# Altium PCB GR_Barillet.PcbDoc
Units mm, origin at the board's own origin, x right, y up, seen from the top; angles counter-clockwise.
Board outline 110 x 55 mm, 2 copper layers (Top Layer, Bottom Layer); 57 components, 59 nets, 210 pads, 24 vias.
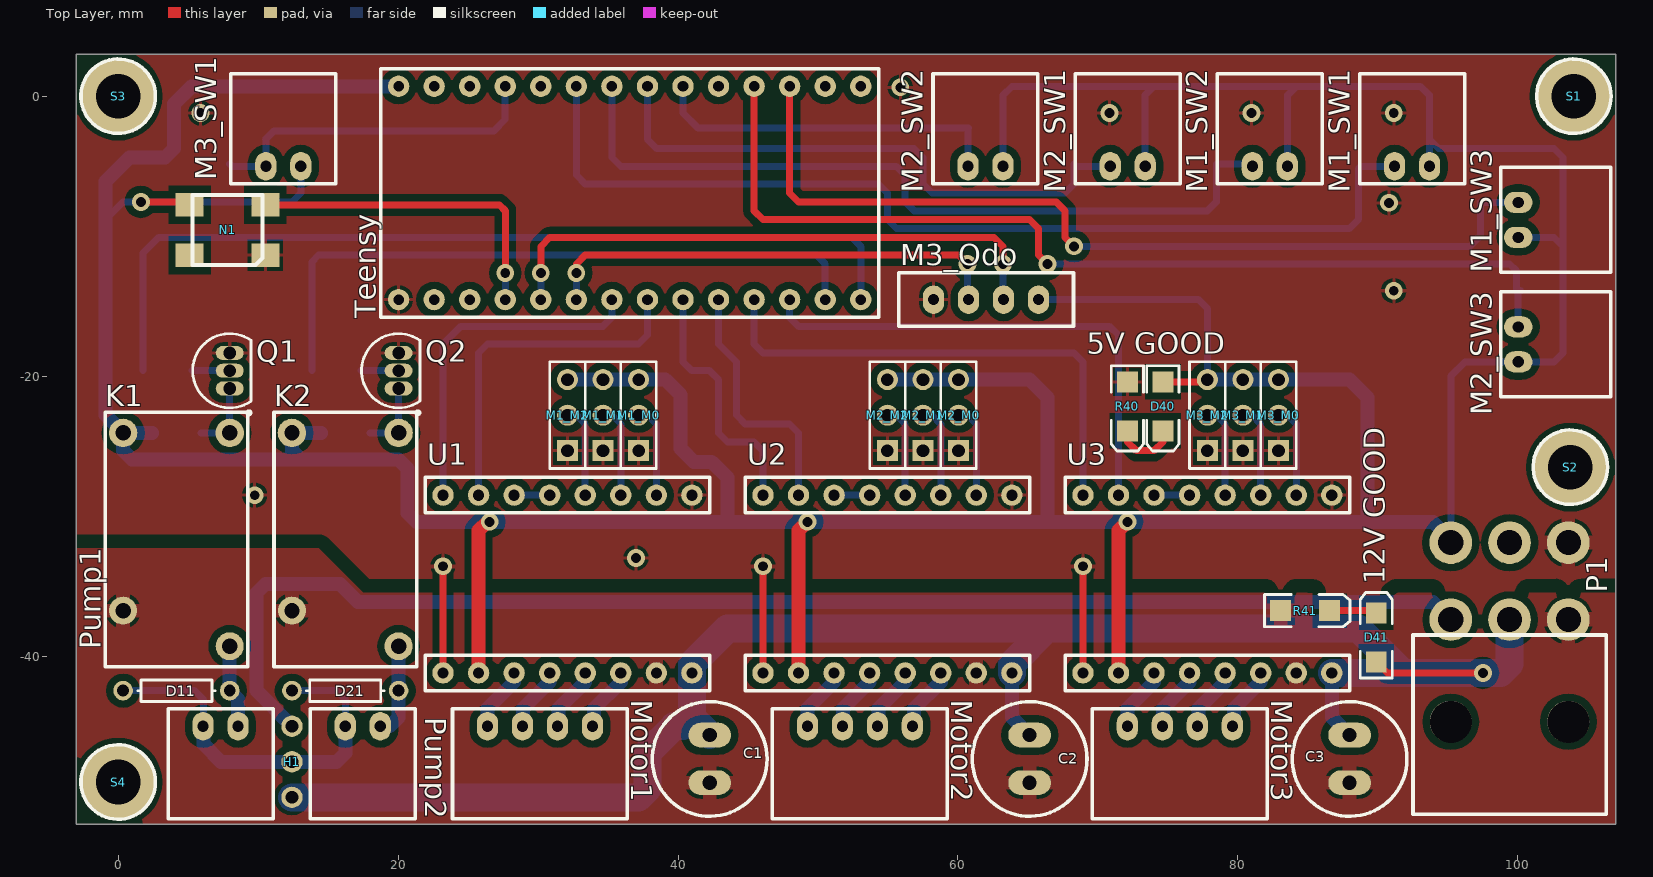
[diagram p0: Top Layer view]
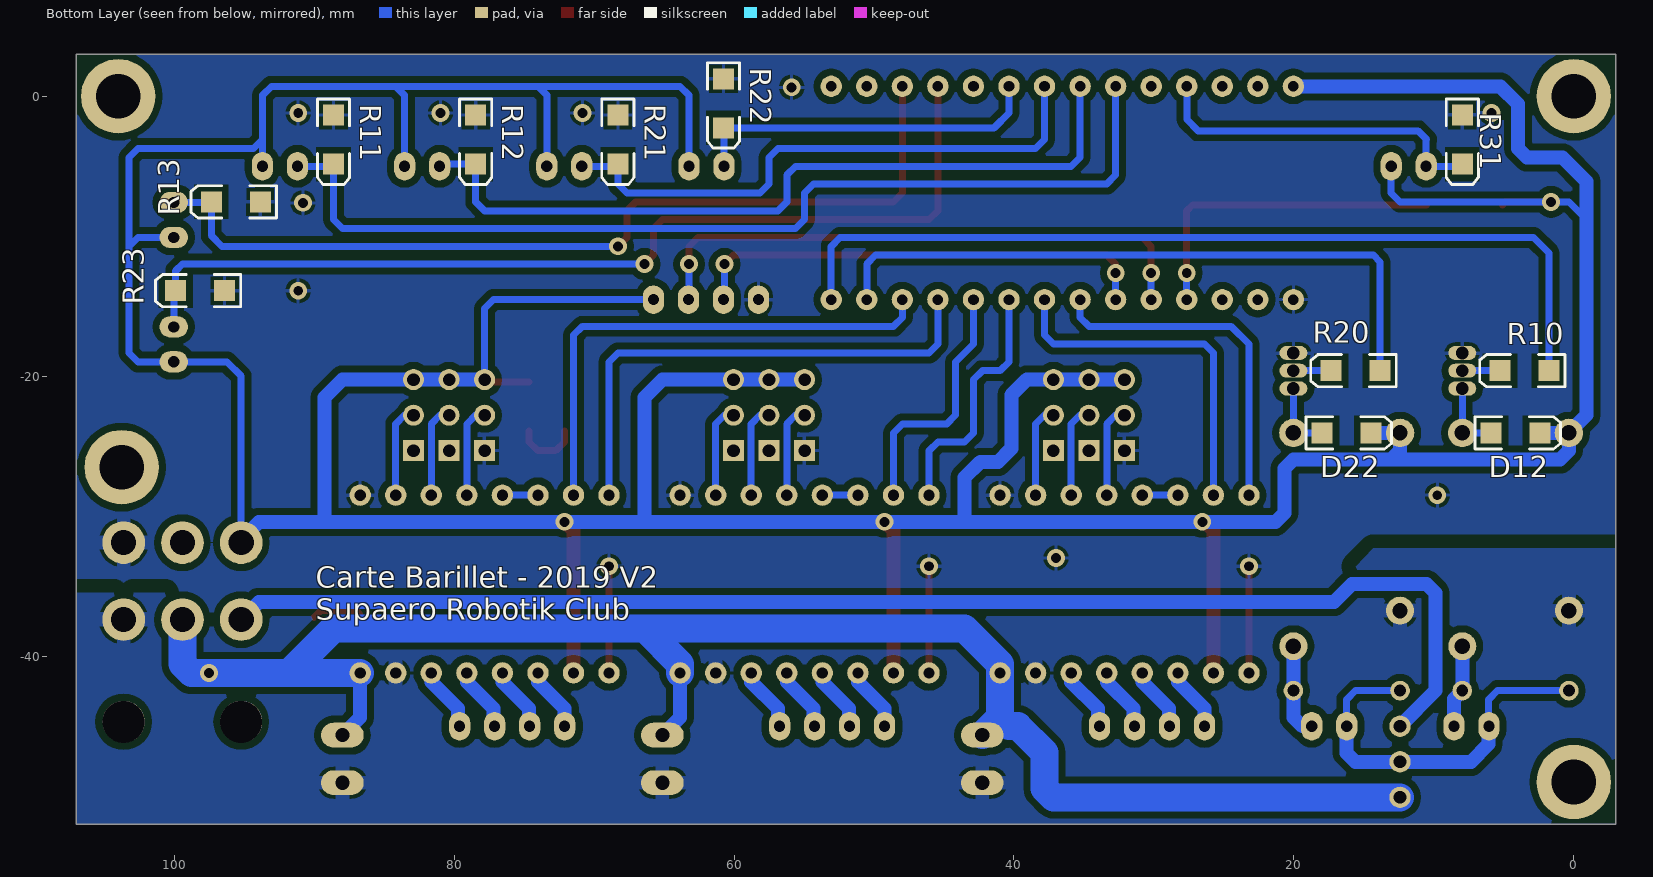
[diagram p1: Bottom Layer view, seen from below]

## Layer stack, top to bottom
Top Solder: solder mask 0.0102, Solder Resist, Dk 3.5
Top Layer: signal copper 0.0356
Dielectric 1: dielectric 0.32, FR-4, Dk 4.8
Bottom Layer: signal copper 0.0356
Bottom Solder: solder mask 0.0102, Solder Resist, Dk 3.5

## Board outline
-3,-52 107,-52 107,3 -3,3

## Design rules (kind name [scope] priority, off if disabled: settings)
Clearance 2 [All] p1: gap=0.254 except(0.508: Arc-Poly Track-Poly SMDPad-Poly THPad-Poly Via-Poly Fill-Poly Poly-Region Poly-Text; 1.016: Poly-Poly)
ComponentClearance VoltSlect [All] p1: gap=0 collisioncheckmode=3 verticalgap=0 showdistances=FALSE
ComponentClearance "Resistance LED" [HasFootprint('3.2X1.6X1.1') vs HasFootprint('3.2X1.6X1.1')] p2: gap=0 collisioncheckmode=3 verticalgap=0 showdistances=FALSE
ComponentClearance "Header Motor 3D" [OnMechanical vs OnMechanical] p3: gap=0 collisioncheckmode=3 verticalgap=0 showdistances=FALSE
ComponentClearance "Header Motor" [HasFootprint('HDR1X3') vs OnMechanical Or HasFootprint('HDR1X3')] p4: gap=0 collisioncheckmode=3 verticalgap=0 showdistances=FALSE
ComponentClearance ComponentClearance_1 [All] p5: gap=0.254 collisioncheckmode=3 verticalgap=0.254 showdistances=FALSE
PolygonConnect PolygonConnect_GNDL [InNet('GND_L') vs HasFootprint('MOLEX_MINIFITJR_3X2')] p1: connectstyle=Relief reliefconductorwidth=1.016 reliefentries=4 polygonreliefangle="90 Angle" airgapwidth=0.254
PolygonConnect PolygonConnect_GNDA [InNet('GND_A')] p2: connectstyle=Relief reliefconductorwidth=1.016 reliefentries=4 polygonreliefangle="90 Angle" airgapwidth=0.254
PolygonConnect PolygonConnect_1 [All] p3: connectstyle=Relief reliefconductorwidth=0.254 reliefentries=4 polygonreliefangle="90 Angle" airgapwidth=0.254
RoutingVias [All] p1: holewidth=0.711 width=1.27 viastyle="Through Hole" minholewidth=0.711 minwidth=1.27 maxholewidth=0.711 maxwidth=1.27
SolderMaskExpansion [All] p1: expansion=0.102
Width [All] p1: maxlimit=2 minlimit=0.254 preferedwidth=0.5
29 further rules are at their usual default settings.

## Components (designator, comment, footprint, x,y, rotation, side; value= is the part's Value field where it differs from the comment)
C1 "Cap2" Condensateur 42.26,-45.65 r270 top
C2 "Cap2" Condensateur 65.12,-45.65 r270 top
C3 "Cap2" Condensateur 87.98,-45.65 r270 top
D11 "Diode" AXIAL-0.3 4.16,-42.475 r180 top
D12 "Diode" 3.2X1.6X1.1 4.16,-24.06 r180 bottom
D21 "Diode" AXIAL-0.3 16.225,-42.475 r180 top
D22 "Diode" 3.2X1.6X1.1 16.225,-24.06 r180 bottom
D40 "LED0" 3.2X1.6X1.1 74.645,-22.155 r270 top
D41 "LED0" 3.2X1.6X1.1 89.885,-38.665 r90 top
H1 "Voltage Selector" "VOLTAGE SELECTOR" 12.415,-47.555 r180 top
K1 "Relay-SPST" Relay 4.16,-31.68 r0 top
K2 "Relay-SPST" Relay 16.225,-31.68 r0 top
M1_M0 "Header 3" HDR1X3 37.18,-25.33 r90 top
M1_M1 "Header 3" HDR1X3 34.64,-25.33 r90 top
M1_M2 "Header 3" HDR1X3 32.1,-25.33 r90 top
M1_SW1 "Header 2H" "Molex SPOX 2x1H" 93.695,-5.01 r180 top
M1_SW2 "Header 2H" "Molex SPOX 2x1H" 83.535,-5.01 r180 top
M1_SW3 "Header 2H" "Molex SPOX 2x1H" 100.03,-10.09 r90 top
M2_M0 "Header 3" HDR1X3 60.04,-25.33 r90 top
M2_M1 "Header 3" HDR1X3 57.5,-25.33 r90 top
M2_M2 "Header 3" HDR1X3 54.96,-25.33 r90 top
M2_SW1 "Header 2H" "Molex SPOX 2x1H" 73.375,-5.01 r180 top
M2_SW2 "Header 2H" "Molex SPOX 2x1H" 63.215,-5.01 r180 top
M2_SW3 "Header 2H" "Molex SPOX 2x1H" 100.03,-18.98 r90 top
M3_M0 "Header 3" HDR1X3 82.9,-25.33 r90 top
M3_M1 "Header 3" HDR1X3 80.36,-25.33 r90 top
M3_M2 "Header 3" HDR1X3 77.82,-25.33 r90 top
M3_Odo "Header 4H" "Molex SPOX 4x1H" 65.755,-14.535 r180 top
M3_SW1 "Header 2H" "Molex SPOX 2x1H" 13.05,-5.01 r180 top
Motor1 "Header 4H" "Molex SPOX 4x1H" 26.385,-45.015 r0 top
Motor2 "Header 4H" "Molex SPOX 4x1H" 49.245,-45.015 r0 top
Motor3 "Header 4H" "Molex SPOX 4x1H" 72.105,-45.015 r0 top
N1 "NeoPixel" Neopixel 10.51,-11.36 r180 top
P1 "Header 3X2H" MOLEX_MINIFITJR_3X2 99.41,-37.395 r0 top
Pump1 "Header 2H" "Molex SPOX 2x1H" 6.065,-45.015 r0 top
Pump2 "Header 2H" "Molex SPOX 2x1H" 16.225,-45.015 r0 top
Q1 "NPN" TO-226-AA 7.97,-19.615 r0 top
Q2 "NPN" TO-226-AA 20.035,-19.615 r0 top
R10 "Res2" 3.2X1.6X1.1 3.525,-19.615 r0 bottom
R11 "Res1" 3.2X1.6X1.1 88.615,-3.105 r270 bottom
R12 "Res1" 3.2X1.6X1.1 78.455,-3.105 r270 bottom
R13 "Res1" 3.2X1.6X1.1 95.6,-7.55 r0 bottom
R20 "Res2" 3.2X1.6X1.1 15.59,-19.615 r0 bottom
R21 "Res1" 3.2X1.6X1.1 68.295,-3.105 r270 bottom
R22 "Res1" 3.2X1.6X1.1 60.75,-0.505 r270 bottom
R23 "Res1" 3.2X1.6X1.1 98.14,-13.9 r0 bottom
R31 "Res1" 3.2X1.6X1.1 7.97,-3.105 r270 bottom
R40 "Res2" 3.2X1.6X1.1 72.105,-22.155 r270 top
R41 "Res2" 3.2X1.6X1.1 84.805,-36.76 r0 top
S1 "Screw M3" "Screw M3" 104,0 r0 top
S2 "Screw M3" "Screw M3" 103.75,-26.505 r0 top
S3 "Screw M3" "Screw M3" 0,0 r0 top
S4 "Screw M3" "Screw M3" 0,-49 r0 top
Teensy "Teensy 3.2" teensy 40.355,-17.075 r90 top
U1 "DRV8825" DRV8825 40.99,-28.505 r270 top
U2 "DRV8825" DRV8825 63.85,-28.505 r270 top
U3 "DRV8825" DRV8825 86.71,-28.505 r270 top

## Footprints (in the part's own frame and the unit in brackets; to place one, negate y for a bottom-side part, rotate by r counter-clockwise, add the part's x,y. Pads: shape width x height; smd on the part's side, far side on the other; paste and mask are expansions set on the pad)
3.2X1.6X1.1 [mm] "SMT LED; 2 Flat Leads"
  rect 1.5x1.5 smd: 1(-1.75,0) 2(1.75,0)
  silkscreen extent -2.9,-1.15 3.2,1.15
AXIAL-0.3 [mm] "Axial Device, Thru-Hole; 2 Leads; 0.3 in Pin Spacing"
  round 1.4 hole 0.85: 1(-3.81,0) 2(3.81,0)
  silkscreen extent -2.77,-0.76 2.77,0.76
Condensateur [mil]
  oval 70x120 hole 40: 1(0,0) 2(133.86,0)
  silkscreen extent -94,-161 228,161, body extent -93,-160 227,160, height 500
DRV8825 [mil] "Stepper Driver"
  round 60 hole 31.5: 1(0,0) 2(0,-100) 3(0,-200) 4(0,-300) 5(0,-400) 6(0,-500) 7(0,-600) 8(0,-700) 9(500,-700) 10(500,-600) 11(500,-500) 12(500,-400) 13(500,-300) 14(500,-200) 15(500,-100) 16(500,0)
  silkscreen extent -50,-750 550,50, body extent -50,-764 550,63, height 446
HDR1X3 [mm] "Connector; Header; 3 Position"
  rect 1.5x1.5 hole 0.9: 1(0,0)
  round 1.5 hole 0.9: 2(2.54,0) 3(5.08,0)
  silkscreen extent -1.27,-1.27 6.35,1.27
"Molex SPOX 2x1H" [mil] "Prise CI, Molex, 3 Contacts, 1 rangée, entraxe 2.5mm, 3A, Coudé, ref 22-03-5035"
  oval 60x80 hole 31.5: 1(0,0) 2(98.43,0)
  silkscreen extent -98,-260 197,49, body extent -98,-262 193,49, height 193
"Molex SPOX 4x1H" [mil] "Prise CI, Molex, 3 Contacts, 1 rangée, entraxe 2.5mm, 3A, Coudé, ref 22-03-5035"
  oval 60x80 hole 31.5: 1(0,0) 2(98.43,0) 3(196.85,0) 4(295.28,0)
  silkscreen extent -98,-75 394,75
MOLEX_MINIFITJR_3X2 [mm] "MOLEX_MINIFITJR_3X2, 39-30-1060"
  round 3.048 hole 1.8: 1(-4.2,5.5) 2(-4.2,0) 3(0,5.5) 4(0,0) 5(4.2,5.5) 6(4.2,0)
  round 3 hole 3 unplated: 10(-4.2,-7.3) 11(4.2,-7.3)
  silkscreen extent -6.9,-13.9 6.9,-1.1, body extent -6.9,-13.9 7.3,6.04, height 11.41
Neopixel [mm]
  rect 2x1.7 smd: 1(0,0) 2(0,-3.6) 3(5.4,-3.6) 4(5.4,0)
  silkscreen extent 0.2,-4.3 5.2,0.7, body extent 0.19,-4.33 5.19,0.67, height 2
Relay [mm] "SPST-NO Relay"
  round 2 hole 1.1: 1(3.81,-7.62) 2(-3.81,-5.08)
  round 2.032 hole 1.1: 3(-3.81,7.62) 4(3.81,7.62)
  silkscreen extent -5.09,-9.09 5.09,9.09, body extent -5.08,-9.14 5.08,9.14, height 15
"Screw M3" [mm] "M3 iso Screw"
  round 5.32 hole 3.2 unplated: 0(0,0)
  silkscreen extent -2.66,-2.66 2.66,2.66
teensy [mil] "Teensy 3.2"
  round 60 hole 30: 0(100,700) 1(100,600) 2(100,500) 3(100,400) 4(100,300) 5(100,200) 6(100,100) 7(100,0) 8(100,-100) 9(100,-200) 10(100,-300) 11(100,-400) 12(100,-500) 13(700,-500) 14(700,-400) 15(700,-300) 16(700,-200) 17(700,-100) 18(700,0) 19(700,100) 20(700,200) 21(700,300) 22(700,400) 23(700,500) 41(700,600) 42(700,700) 43(700,800) 44(100,800)
  silkscreen extent 50,-550 750,850, body extent 48,-550 752,907, height 505
TO-226-AA [mm] "TO, Flat Index; 3 In-Line, Axial Leads; Body Dia. 4.8mm; Leads 0.55 x 0.51 mm (max)"
  oval 2x1 hole 0.9: 1(0,-1.27) 2(0,0) 3(0,1.27)
  silkscreen extent -2.65,-3.13 1.52,2.65, body extent -2.65,-2.66 1.52,2.66, height 5.33
"VOLTAGE SELECTOR" [mil] "3 Pads for Voltage Selection"
  round 60 hole 35.43: 1(0,100) 2(0,-100) 3(0,0)
  body extent -50,-150 50,150, height 340

## Part data
C1 C2 C3: "Capacitor"
D11 D12 D21 D22: "Default Diode"
D40 D41: "Typical INFRARED GaAs LED"
H1: "Selection of voltage by soldering pads"
K1 K2: "Single-Pole Single-Throw Relay"
M1_M0 M1_M1 M1_M2 M2_M0 M2_M1 M2_M2 M3_M0 M3_M1 M3_M2: "Header, 3-Pin"
M1_SW1 M1_SW2 M1_SW3 M2_SW1 M2_SW2 M2_SW3 M3_SW1 Pump1 Pump2: "Header, 2-Pin, Right Angle"
M3_Odo Motor1 Motor2 Motor3: "Header, 4-Pin, Right Angle"
P1: "Header, 3-Pin, Dual row, Right Angle"
Q1 Q2: "NPN Bipolar Transistor"
R10 R20 R40 R41: "Resistor"
R11 R12 R13 R21 R22 R23 R31: library part Res2, "Resistor"
Teensy: library part teensy3.2
U1 U2 U3: "Stepper Driver Module"

## Via types
v1: diameter 1.27, hole 0.711, Top Layer to Bottom Layer, 17 vias
v2: diameter 1.27, hole 0.7, Top Layer to Bottom Layer, 7 vias

## Nets (pads, with @x,y where several pads share a name; then routed paths per layer and width w, separated by ;. In a path a pad name is that pad's centre, name@x,y a point inside that pad or via, vN(x,y) a via of type N, cw(c..) or ccw(c..) an arc to the next point about the centre after c; other vN are vias at no path point)
3V3_A: H1.2 P1.2 | length 97.2
  Bottom Layer w1: H1.2 9.875,-42.475 9.875,-35.49 10.51,-34.855 15.855,-34.855 17.125,-36.125 93.94,-36.125 P1.2
5V_L: D12.2 D22.2 D40.1 K1.3 K2.3 M1_M0.3 M1_M1.3 M1_M2.3 M1_SW1.1 M1_SW2.1 M1_SW3.1 M2_M0.3 M2_M1.3 M2_M2.3 M2_SW1.1 M2_SW2.1 M2_SW3.1 M3_M0.3 M3_M1.3 M3_M2.3 M3_Odo.1 M3_SW1.1 N1.3 P1.1 Teensy.43 U1.10 U2.10 U3.10 | length 387.8
  Top Layer w0.5: v1(1.62,-7.55) 4.9,-7.55 N1.3 ; D40.1 77.665,-20.405 M3_M2.3
  Top Layer w1: U1.10 25.75,-31.045 26.385,-30.41 v1(26.544,-30.41) ; U2.10 48.61,-31.045 v1(49.245,-30.41) ; U3.10 71.47,-31.045 v1(72.105,-30.41)
  Bottom Layer w0.5: -0.92,-8.82 0.35,-7.55 v1(1.62,-7.55) 12.415,-7.55 13.05,-6.915 M3_SW1.1 ; M2_SW2.1 63.215,0.07 63.85,0.705 74.01,0.705 ; M3_Odo.1 77.185,-14.535 77.82,-15.17 M3_M2.3 ; M2_SW1.1 73.375,0.07 74.01,0.705 ; M1_SW2.1 83.535,0.07 84.17,0.705 ; M1_SW1.1 93.695,-3.105 ; P1.1 95.21,-20.005 96.235,-18.98 M2_SW3.1 102.585,-18.98 103.22,-18.345 103.22,-10.725 ; M1_SW3.1 102.585,-10.09 103.22,-10.725 ; 74.01,0.705 84.17,0.705 ; 84.17,0.705 93.06,0.705 93.695,0.07 93.695,-3.105 ; 93.695,-3.105 94.33,-3.74 102.585,-3.74 103.22,-4.375 103.22,-10.725
  Bottom Layer w1: D12.2 K1.3 ; D22.2 K2.3 12.415,-25.33 13.05,-25.965 ; Teensy.43@20.02,0.705 5.255,0.705 4,-0.55 4,-3.725 3.35,-4.375 0.81,-4.375 -0.92,-6.105 -0.92,-22.79 K1.3 ; M1_M2.3 M1_M1.3 M1_M0.3 39.085,-20.25 40.192,-21.358 40.192,-25.183 41.137,-26.127 42.407,-26.127 43.53,-27.25 43.53,-30.41 ; M2_M2.3 M2_M1.3 M2_M0.3 ; M2_M0.3@60.055,-20.25 65.12,-20.25 66.39,-21.52 66.39,-30.41 ; M3_M2.3 M3_M1.3 M3_M0.3 ; M3_M0.3@82.915,-20.25 87.98,-20.25 89.25,-21.52 89.25,-30.41 ; P1.1@95.21,-31.68 93.94,-30.41 21.305,-30.41 20.67,-29.775 20.67,-26.6 20.035,-25.965 13.05,-25.965 ; K1.3 0.35,-25.33 0.985,-25.965 13.05,-25.965
12V_A: C1.1 C2.1 C3.1 D41.1 H1.1 P1.4 U1.16 U2.16 U3.16 | length 129.5
  Top Layer w0.5: D41.1 90.675,-41.205 v2(97.505,-41.205)
  Bottom Layer w1: U2.16 63.85,-44.38 C2.1 ; U3.16 86.71,-44.38 C3.1
  Bottom Layer w2: H1.1 37.18,-50.095 37.815,-49.46 37.815,-46.905 39.705,-45.015 40.355,-45.015 40.99,-44.38 ; C1.1 40.99,-44.38 ; U2.16 63.85,-40.555 66.375,-38.03 ; U3.16 91.79,-41.205 ; P1.4 99.41,-40.57 98.775,-41.205 v2(97.505,-41.205) 91.79,-41.205 ; 40.99,-44.38 U1.16 40.99,-40.57 43.53,-38.03 88.615,-38.03 91.79,-41.205
15V_L: P1.3
GND_A: C1.2 C2.2 C3.2 K1.2 K2.2 P1.6 R41.1 U1.15 U2.15 U3.15
GND_L: M1_M0.1 M1_M1.1 M1_M2.1 M2_M0.1 M2_M1.1 M2_M2.1 M3_M0.1 M3_M1.1 M3_M2.1 M3_Odo.4 N1.1 P1.5 Q1.3 Q2.3 R11.1 R12.1 R13.1 R21.1 R22.1 R23.1 R31.1 R40.1 Teensy.44 U1.1 U1.9 U2.1 U2.9 U3.1 U3.9 | length 22.9
  Top Layer w0.5: U1.9 v1(23.21,-33.585) ; U2.9 v1(46.07,-33.585) ; U3.9 v1(68.93,-33.585)
  other v1: 90.805,-7.62 5.89,-1.2 55.88,0.635
  other v2: 37,-33 9.75,-28.505 91.14,-13.9 70.82,-1.2 80.98,-1.2 91.14,-1.2
M1_DIR: Teensy.5 U1.8 | length 24.9
  Bottom Layer w0.5: U1.8 23.21,-17.71 24.48,-16.44 34.64,-16.44 35.275,-15.805 Teensy.5
M1_M0: M1_M0.2 U1.2 | length 6.6
  Bottom Layer w0.5: M1_M0.2 37.815,-22.79 38.45,-23.425 U1.2
M1_M1: M1_M1.2 U1.3 | length 6.6
  Bottom Layer w0.5: M1_M1.2 35.275,-22.79 35.91,-23.425 U1.3
M1_M2: M1_M2.2 U1.4 | length 6.6
  Bottom Layer w0.5: M1_M2.2 32.735,-22.79 33.37,-23.425 U1.4
M1_STP: Teensy.6 U1.7 | length 25.3
  Bottom Layer w0.5: U1.7 25.75,-18.345 26.385,-17.71 37.18,-17.71 37.815,-17.075 Teensy.6
M1_SW1: M1_SW1.2 R11.2 Teensy.21 | length 71.5
  Bottom Layer w0.5: Teensy.21 32.735,-5.645 33.37,-6.28 54.325,-6.28 54.96,-6.915 54.96,-8.82 55.595,-9.455 87.98,-9.455 88.615,-8.82 88.615,-5.165 88.77,-5.01 M1_SW1.2
M1_SW2: M1_SW2.2 R12.2 Teensy.20 | length 56.6
  Bottom Layer w0.5: Teensy.20 35.275,-4.375 35.91,-5.01 55.595,-5.01 56.23,-5.645 56.23,-7.55 56.865,-8.185 77.82,-8.185 78.455,-7.55 R12.2 80.88,-4.855 M1_SW2.2
M1_SW3: M1_SW3.2 R13.2 Teensy.15 | length 65.1
  Top Layer w0.5: Teensy.15 47.975,-6.915 48.61,-7.55 67.025,-7.55 67.66,-8.185 67.66,-10.09 v1(68.295,-10.725)
  Bottom Layer w0.5: v1(68.295,-10.725) 96.59,-10.725 97.35,-9.965 R13.2 ; R13.2@97.39,-7.59 M1_SW3.2
M2_DIR: Teensy.7 U2.8 | length 18.2
  Bottom Layer w0.5: Teensy.7 40.355,-18.98 40.99,-19.615 42.26,-19.615 42.895,-20.25 42.895,-24.06 43.53,-24.695 45.435,-24.695 46.07,-25.33 U2.8
M2_M0: M2_M0.2 U2.2 | length 6.6
  Bottom Layer w0.5: M2_M0.2 60.675,-22.79 61.31,-23.425 U2.2
M2_M1: M2_M1.2 U2.3 | length 6.6
  Bottom Layer w0.5: M2_M1.2 58.135,-22.79 58.77,-23.425 U2.3
M2_M2: M2_M2.2 U2.4 | length 6
  Bottom Layer w0.5: M2_M2.2@55.595,-22.79 56.23,-23.425 U2.4
M2_STP: Teensy.8 U2.7 | length 18.2
  Bottom Layer w0.5: Teensy.8 42.895,-17.71 44.165,-18.98 44.165,-22.79 44.8,-23.425 47.975,-23.425 48.61,-24.06 U2.7
M2_SW1: M2_SW1.2 R21.2 Teensy.19 | length 41.3
  Bottom Layer w0.5: Teensy.19 37.815,-3.105 38.45,-3.74 56.865,-3.74 57.5,-4.375 57.5,-6.28 58.135,-6.915 67.66,-6.915 68.295,-6.28 R21.2 68.45,-5.01 M2_SW1.2
M2_SW2: M2_SW2.2 R22.2 Teensy.18 | length 25.5
  Bottom Layer w0.5: Teensy.18 40.355,-1.2 41.41,-2.255 R22.2 60.715,-2.29 M2_SW2.2
M2_SW3: M2_SW3.2 R23.2 Teensy.16 | length 69.7
  Top Layer w0.5: Teensy.16 45.435,-8.185 46.07,-8.82 65.12,-8.82 65.755,-9.455 65.755,-11.36 v1(66.39,-11.995)
  Bottom Layer w0.5: v1(66.39,-11.995) 99.41,-11.995 99.89,-12.475 R23.2 ; M2_SW3.2@100.03,-15.845 100.03,-14.055 R23.2@100.185,-13.9
M3_A: M3_Odo.2 Teensy.3 | length 41.2
  Top Layer w0.5: v1(30.195,-12.63) 30.195,-10.725 30.83,-10.09 62.58,-10.09 63.215,-10.725 v1(63.215,-11.995)
  Bottom Layer w0.5: Teensy.3 v1(30.195,-12.63) ; v1(63.215,-11.995) 63.215,-14.495 M3_Odo.2
M3_B: M3_Odo.3 Teensy.4 | length 33.6
  Top Layer w0.5: v1(32.735,-12.63) 32.735,-11.995 33.37,-11.36 60.04,-11.36 v1(60.675,-11.995)
  Bottom Layer w0.5: Teensy.4 v1(32.735,-12.63) ; v1(60.675,-11.995) 60.675,-14.455 M3_Odo.3
M3_DIR: Teensy.9 U3.8 | length 36.7
  Bottom Layer w0.5: Teensy.9 45.435,-17.71 46.07,-18.345 68.295,-18.345 68.93,-18.98 U3.8
M3_M0: M3_M0.2 U3.2 | length 6.6
  Bottom Layer w0.5: M3_M0.2 83.535,-22.79 84.17,-23.425 U3.2
M3_M1: M3_M1.2 U3.3 | length 6.6
  Bottom Layer w0.5: M3_M1.2 80.995,-22.79 81.63,-23.425 U3.3
M3_M2: M3_M2.2 U3.4 | length 6.6
  Bottom Layer w0.5: M3_M2.2 78.455,-22.79 79.09,-23.425 U3.4
M3_STP: Teensy.10 U3.7 | length 36.7
  Bottom Layer w0.5: Teensy.10 47.975,-15.805 48.61,-16.44 70.835,-16.44 71.47,-17.075 U3.7
M3_SW1: M3_SW1.2 R31.2 Teensy.23 | length 24.7
  Bottom Layer w0.5: R31.2 8.125,-5.01 M3_SW1.2 10.55,-3.145 10.51,-3.105 11.145,-2.47 26.845,-2.47 27.64,-1.675 Teensy.23@27.64,0.705
M3_SW2: Teensy.22
NEOPIXEL: N1.2 Teensy.2 | length 23.7
  Top Layer w0.5: N1.2 27.23,-7.76 27.655,-8.185 v1(27.655,-12.63)
  Bottom Layer w0.5: Teensy.2 v1(27.655,-12.63)
NetD11_1: D11.1 K1.1 Pump1.2 | length 6
  Bottom Layer w1: K1.1 D11.1 8.565,-43.07 Pump1.2
NetD12_1: D12.1 K1.4 Q1.1 | length 5.2
  Bottom Layer w0.5: D12.1 K1.4 Q1.1
NetD21_1: D21.1 K2.1 Pump2.2 | length 6.7
  Bottom Layer w1: Pump2.2 19.4,-45.015 20.035,-44.38 D21.1 K2.1
NetD22_1: D22.1 K2.4 Q2.1 | length 5.2
  Bottom Layer w0.5: D22.1 K2.4 Q2.1
NetD40_2: D40.2 R40.2 | length 4.6
  Top Layer w0.5: R40.2 72.105,-24.695 72.74,-25.33 74.01,-25.33 74.645,-24.695 D40.2
NetD41_2: D41.2 R41.2 | length 3.6
  Top Layer w0.5: R41.2@86.75,-37 86.99,-36.76 89.51,-36.76 D41.2@90,-37.25
NetD42_2: 
NetMotor1_1: Motor1.1 U1.11 | length 4.6
  Bottom Layer w1: Motor1.1 26.385,-43.745 28.29,-41.84 U1.11
NetMotor1_2: Motor1.2 U1.12 | length 4.6
  Bottom Layer w1: Motor1.2@28.925,-45.015 28.925,-43.745 30.83,-41.84 U1.12
NetMotor1_3: Motor1.3 U1.13 | length 4.6
  Bottom Layer w1: Motor1.3@31.465,-45.015 31.465,-43.745 33.37,-41.84 U1.13
NetMotor1_4: Motor1.4 U1.14 | length 4.6
  Bottom Layer w1: Motor1.4@34.005,-45.015 34.005,-43.745 35.91,-41.84 U1.14
NetMotor2_1: Motor2.1 U2.11 | length 4.6
  Bottom Layer w1: Motor2.1 49.245,-43.745 51.15,-41.84 U2.11
NetMotor2_2: Motor2.2 U2.12 | length 4.6
  Bottom Layer w1: Motor2.2@51.785,-45.015 51.785,-43.745 53.69,-41.84 U2.12
NetMotor2_3: Motor2.3 U2.13 | length 4.6
  Bottom Layer w1: Motor2.3@54.325,-45.015 54.325,-43.745 56.23,-41.84 U2.13
NetMotor2_4: Motor2.4 U2.14 | length 4.6
  Bottom Layer w1: Motor2.4@56.865,-45.015 56.865,-43.745 58.77,-41.84 U2.14
NetMotor3_1: Motor3.1 U3.11 | length 4.6
  Bottom Layer w1: Motor3.1 72.105,-43.745 74.01,-41.84 U3.11
NetMotor3_2: Motor3.2 U3.12 | length 4.6
  Bottom Layer w1: Motor3.2@74.645,-45.015 74.645,-43.745 76.55,-41.84 U3.12
NetMotor3_3: Motor3.3 U3.13 | length 4.6
  Bottom Layer w1: Motor3.3@77.185,-45.015 77.185,-43.745 79.09,-41.84 U3.13
NetMotor3_4: Motor3.4 U3.14 | length 4.6
  Bottom Layer w1: Motor3.4@79.725,-45.015 79.725,-43.745 81.63,-41.84 U3.14
NetQ1_2: Q1.2 R10.2 | length 2.7
  Bottom Layer w0.5: R10.2 Q1.2
NetQ2_2: Q2.2 R20.2 | length 2.7
  Bottom Layer w0.5: R20.2 Q2.2
NetU1_5: U1.5 U1.6 | length 2.5
  Bottom Layer w0.5: U1.6 U1.5
NetU2_5: U2.5 U2.6 | length 2.5
  Bottom Layer w0.5: U2.6 U2.5
NetU3_5: U3.5 U3.6 | length 2.5
  Bottom Layer w0.5: U3.6 U3.5
PUMP1: R10.1 Teensy.12 | length 64.2
  Bottom Layer w0.5: R10.1 1.775,-11.205 2.89,-10.09 52.42,-10.09 53.055,-10.725 Teensy.12
PUMP2: R20.1 Teensy.11 | length 47.5
  Bottom Layer w0.5: R20.1 13.84,-11.84 14.32,-11.36 49.88,-11.36 50.515,-11.995 Teensy.11
V_PUMP: D11.2 D21.2 H1.3 Pump1.1 Pump2.1 | length 28
  Bottom Layer w0.5: D11.2 5.445,-42.475 6.08,-43.11 Pump1.1@6.08,-45.015 ; D21.2 15.59,-42.475 16.225,-43.11 Pump2.1
  Bottom Layer w1: Pump1.1@6.08,-45.015 6.08,-46.3 7.335,-47.555 11.78,-47.555 15.59,-47.555 16.225,-46.92 Pump2.1
pads on no net: N1.4 P1.10 P1.11 S1.0 S2.0 S3.0 S4.0 Teensy.0 Teensy.1 Teensy.13 Teensy.14 Teensy.17 Teensy.41 Teensy.42

## Polygon pours and split planes (outlines as drawn)
GND_L on Top Layer "Top GND_L" (solid, remove dead copper, pour order 9): -3,3 107,3 107,-52 -3,-52
GND_A on Top Layer "Top GNDA" (solid, pour order 5): -3,-32.315 14.316,-32.315 17.496,-35.49 107,-35.49 107,-52 -3,-52
GND_L on Bottom Layer "Bottom GND_L" (solid, pour order 7): -3,3 107,3 107,-52 -3,-52
GND_A on Bottom Layer "Bot GND A" (solid, pour order 6): -3,-32.315 14.312,-32.315 17.454,-35.49 107,-35.49 107,-52 -3,-52

## Silkscreen, mask and mechanical layers (free items; w line width, h text height)
Top Overlay:
  text "5V GOOD" at 69.215,-18.415 h1.52
  text "12V GOOD" at 90.505,-34.855 h1.52 r90
Bottom Overlay:
  text "Carte Barillet - 2019 V2 / Supaero Robotik Club" at 89.87,-37.395 h1.52
Mechanical 2:
  the board outline again, w0.254

## Dimensions
103.75,-26.505 to 104,0 on Mechanical 3
107,3 to 107,-52 on Mechanical 3
104,0 to 107,3 on Mechanical 3
104,0 to 107,3 on Mechanical 3
107,-52 to -3,-52 on Mechanical 3